# Altium PCB PCB1.PcbDoc
Units mm, origin at the board's own origin, x right, y up, seen from the top; angles counter-clockwise.
Board outline 56.43 x 50 mm, 4 copper layers (Top Layer, Int1 (GND), Int2 (GND), Bottom Layer), stack 1.96 mm thick; 71 components, 47 nets, 222 pads, 311 vias.
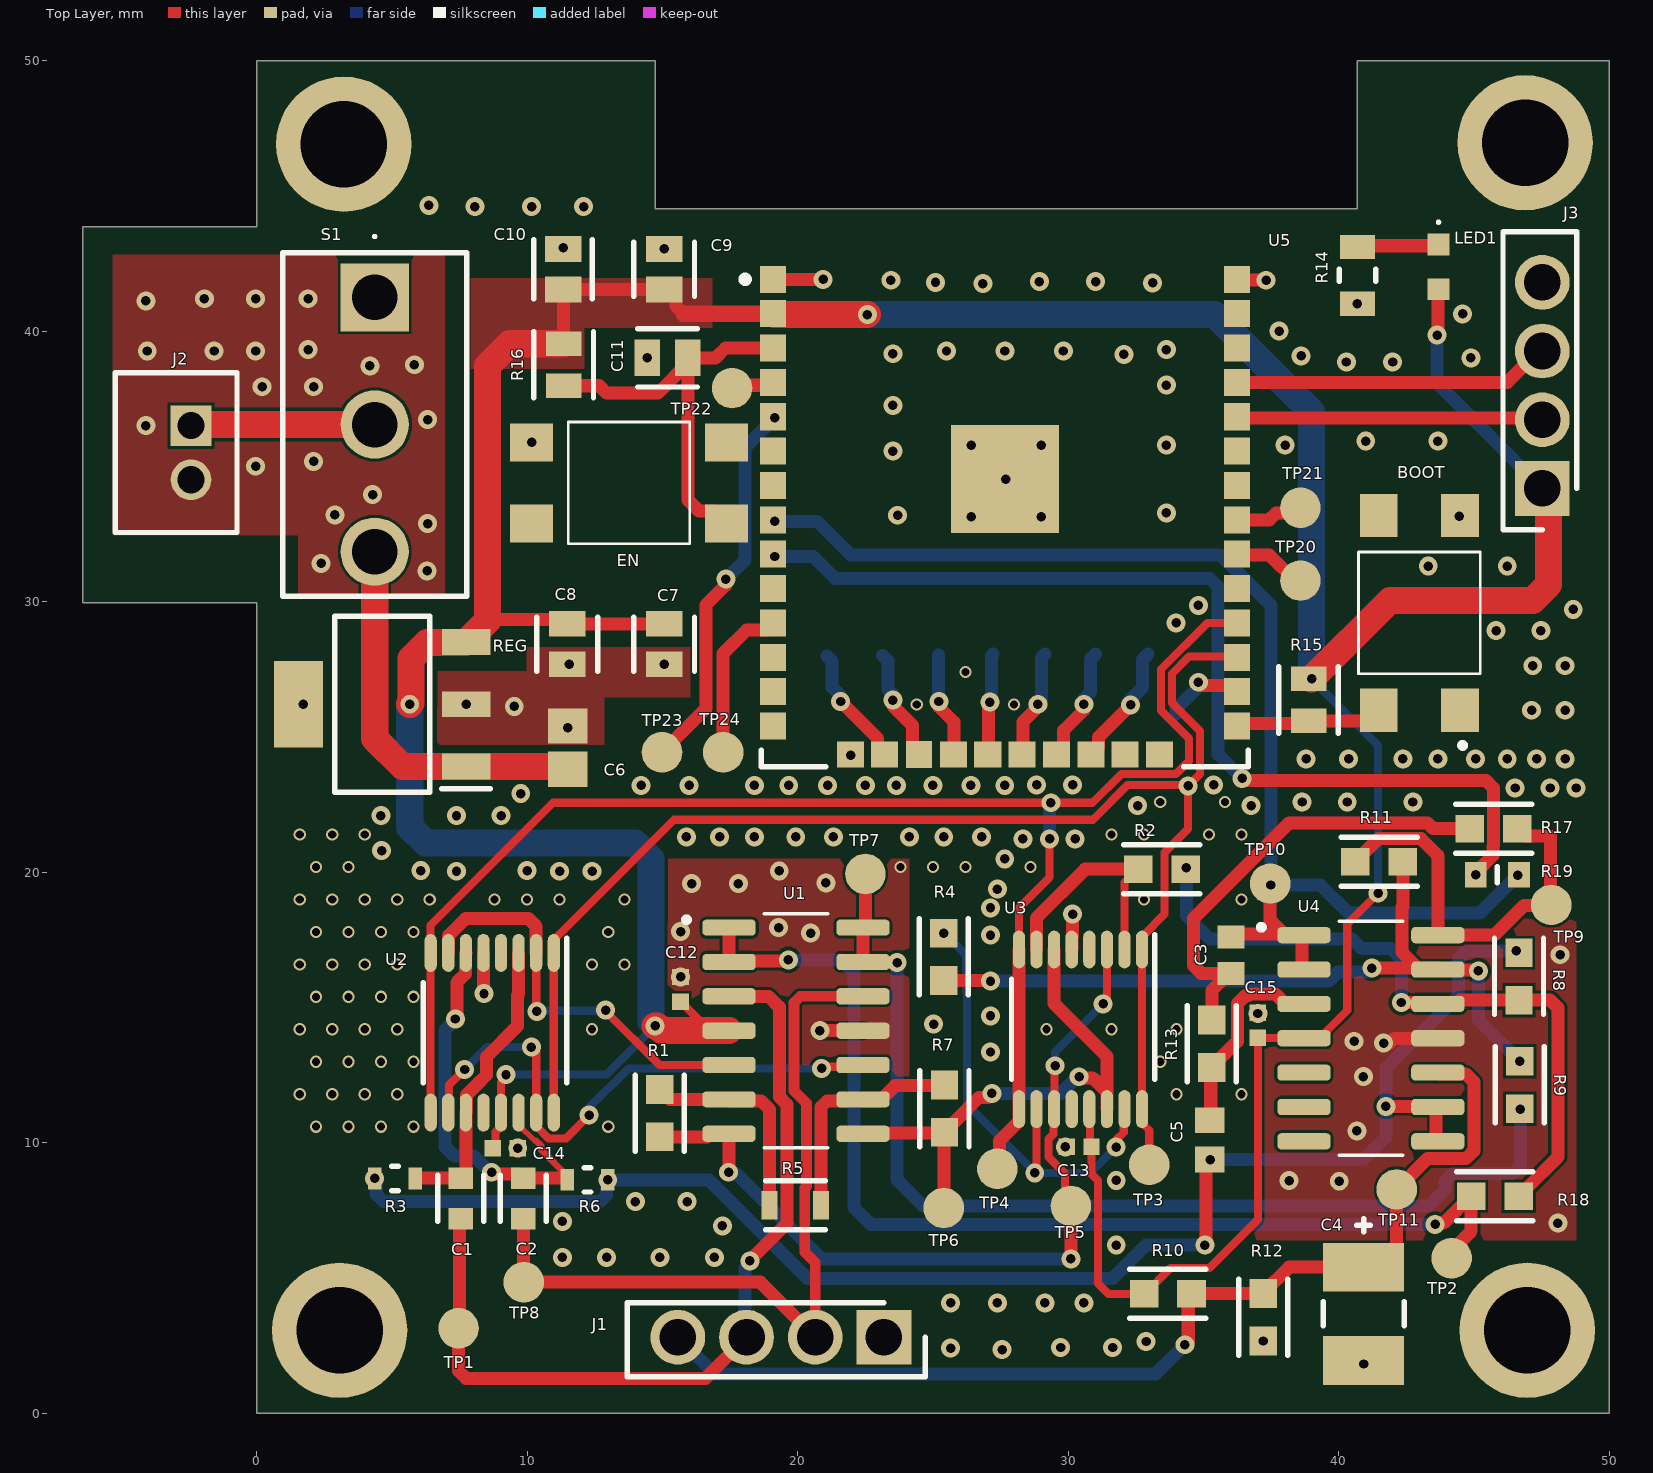
[diagram p0: Top Layer view]
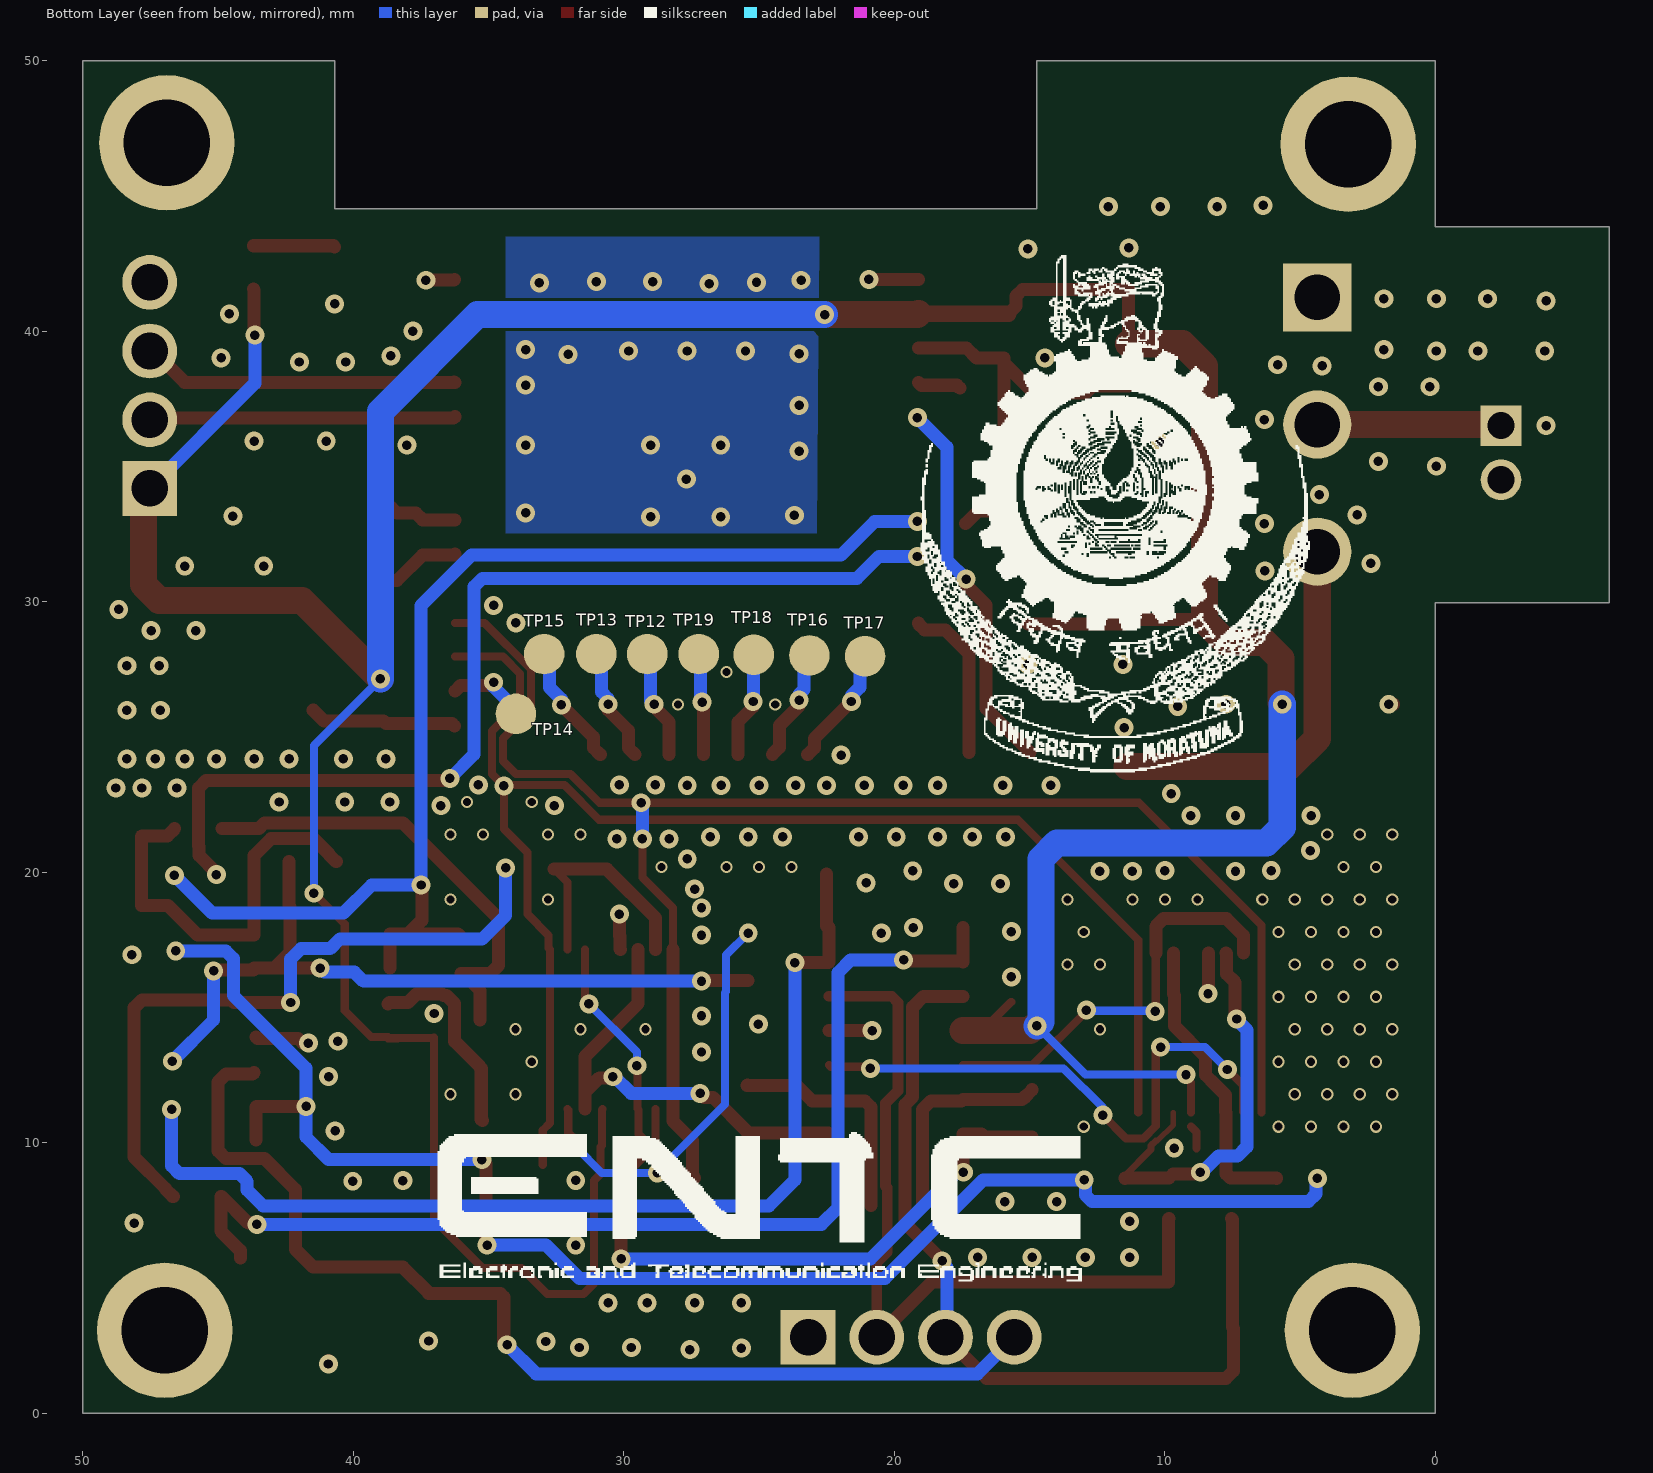
[diagram p1: Bottom Layer view, seen from below]
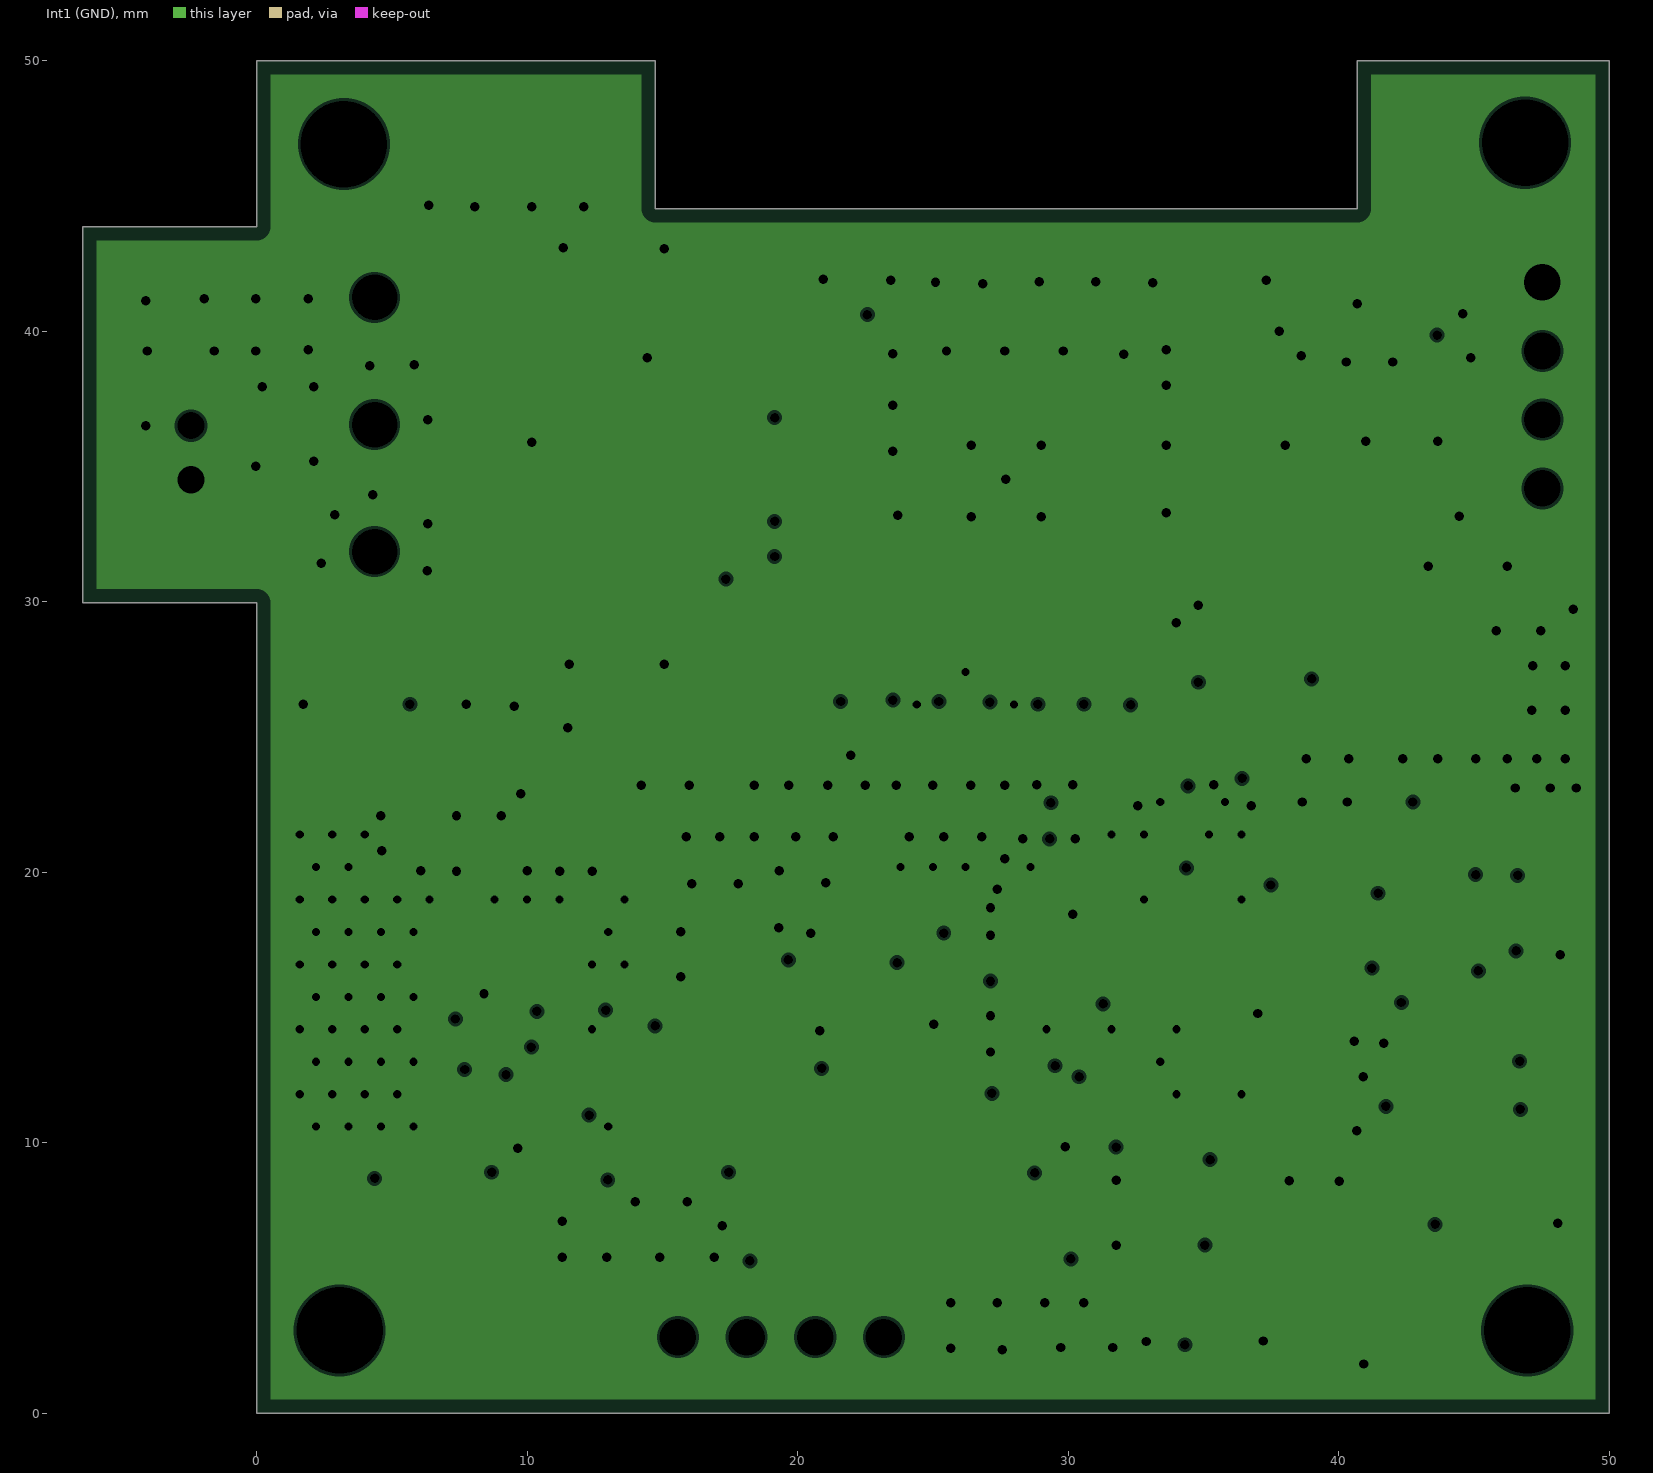
[diagram p2: Int1 (GND), clearances drawn from the general rule]
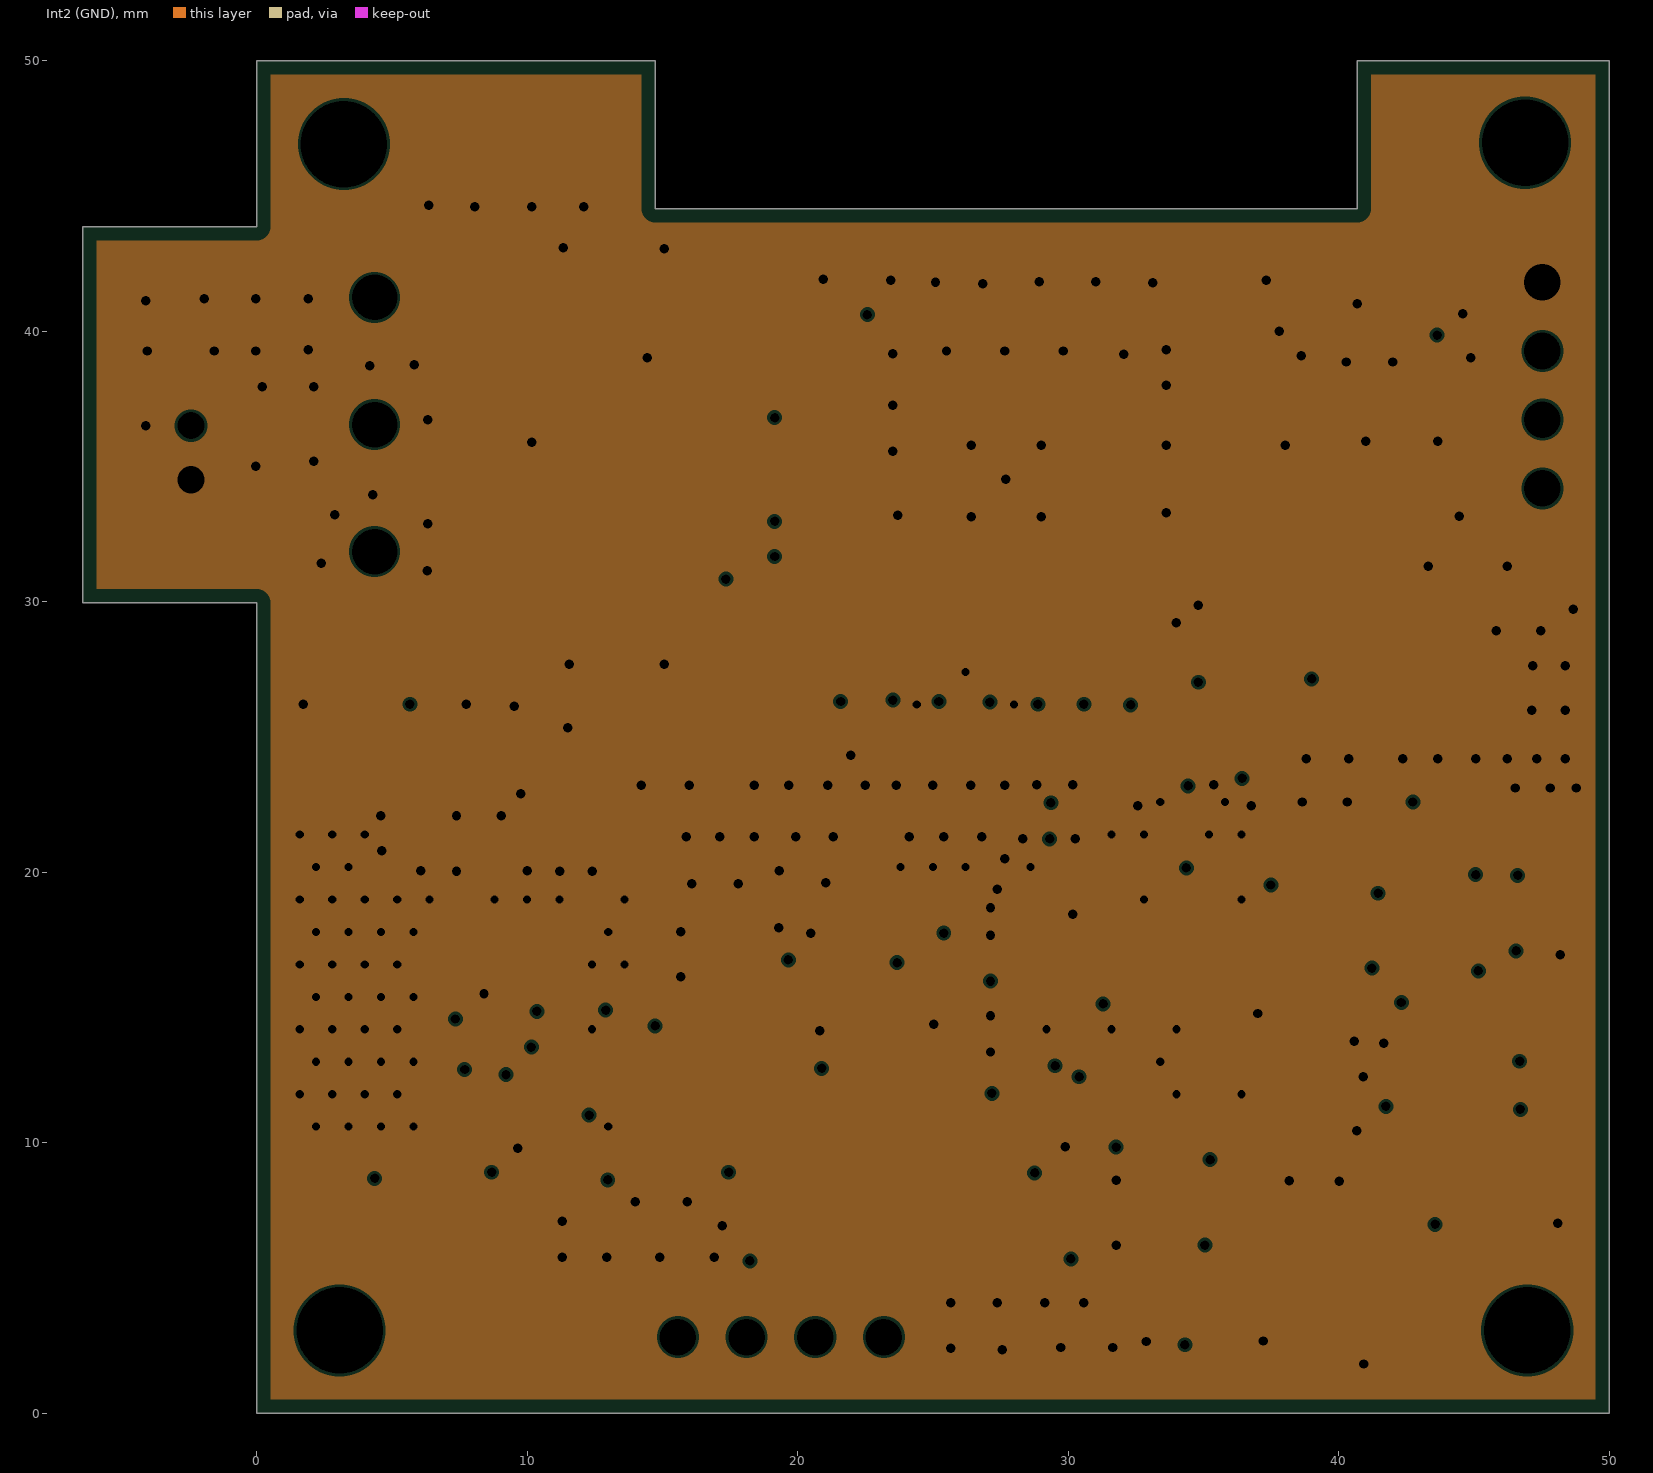
[diagram p3: Int2 (GND), clearances drawn from the general rule]
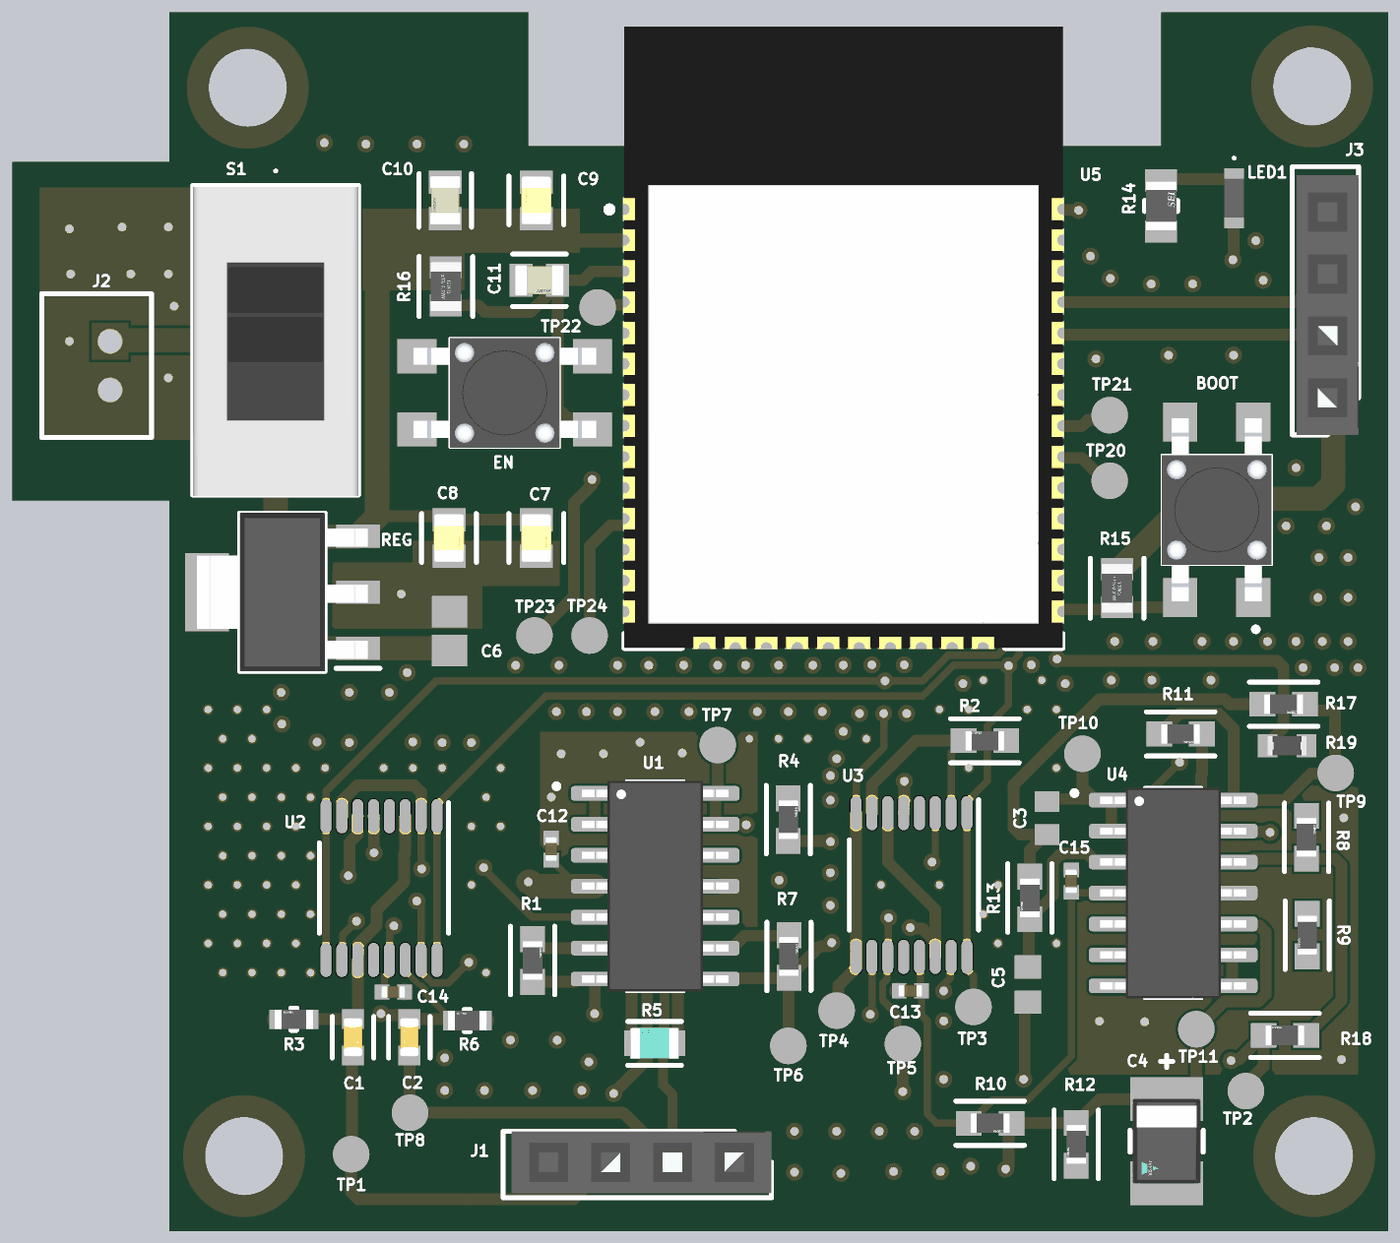
[diagram p4: 3D render of the assembled board from above, using the file's embedded part models]

## Layer stack, top to bottom
Top Solder: solder mask 0.0254, SM-001, Dk 4
Top Layer: signal copper 0.035
Dielectric 1: prepreg 0.11, PP-017, Dk 4.3
Int1 (GND): plane copper 0.035, net GND
Dielectric 3: core 1.6, Core-039, Dk 4.6
Int2 (GND): plane copper 0.035, net GND
Dielectric 2: prepreg 0.11, PP-017, Dk 4.3
Bottom Layer: signal copper 0.035
Bottom Solder: solder mask 0.0254, SM-001, Dk 4

## Board outline
0,43.866 -6.172,43.866 -6.426,43.866 -6.426,29.972 0,29.972 0,0 50,0 50,50 40.691,50 40.691,44.526 14.732,44.526 14.732,50 0,50

## Design rules (kind name [scope] priority, off if disabled: settings)
BoardOutlineClearance [All] p1: gap=0.2 ignorepadtopadclearanceinfootprint=FALSE
Clearance "Stitching GND" [IsStitchingVia and InNet('GND') vs (IsVia and (Not IsStitchingVia)) Or IsPad] p1: gap=0.127 ignorepadtopadclearanceinfootprint=FALSE
Clearance [All] p2: gap=0.102 ignorepadtopadclearanceinfootprint=FALSE except(0.127: Arc-Via Track-Via SMDPad-Via THPad-Via Via-Via Via-Fill Via-Poly Via-Region Via-Text; 0.25: Arc-Hole Track-Hole SMDPad-Hole THPad-Hole Via-Hole Fill-Hole Poly-Hole Region-Hole Text-Hole)
ComponentClearance [All] p1: gap=0.102 collisioncheckmode=3 verticalgap=0.102 showdistances=TRUE
DiffPairsRouting [All] p1: maxlimit=0.102 minlimit=0.102 mostfreqgap=0.102 toplayer_minwidth=0.102 toplayer_maxwidth=1816.048 toplayer_prefwidth=0.102 bottomlayer_minwidth=0.102 bottomlayer_maxwidth=1816.048 bottomlayer_prefwidth=0.102 maxuncoupledlength=12.7
Height [All] p1: minheight=0 maxheight=1816.048 prefheight=12.7
HoleSize [All] p1: absolutevalues=TRUE maxlimit=6.3 minlimit=0.2 maxpercent=80.000 minpercent=20.000
HoleToHoleClearance [All] p1: gap=0.25 allowstackedmicrovias=FALSE
MinimumAnnularRing [All] p1: minimumring=0.076
MinimumSolderMaskSliver [All] p1: minsoldermaskwidth=0
PlaneClearance [All] p1: clearance=0.102
PlaneConnect PlaneConnectPowerPads [InPadClass('PowerPads')] p1: planeconnectstyle=Direct reliefexpansion=0.508 reliefentries=4 reliefconductorwidth=0.254 reliefairgap=0.254
PlaneConnect [All] p2: pad.planeconnectstyle=Relief pad.reliefexpansion=0.3 pad.reliefentries=4 pad.reliefconductorwidth=0.102 pad.reliefairgap=0.102 via.planeconnectstyle=Direct via.reliefexpansion=0.3 via.reliefentries=4 via.reliefconductorwidth=0.127 via.reliefairgap=0.127
PolygonConnect PolygonConnectPowerPads [All vs (InPadClass('PowerPads'))] p1: connectstyle=Direct reliefconductorwidth=0.254 reliefentries=4 polygonreliefangle="90 Angle" airgapwidth=0.254
PolygonConnect [All] p2: connectstyle=Direct reliefconductorwidth=0.102 reliefentries=4 polygonreliefangle="90 Angle" airgapwidth=0.102
RoutingVias [All] p1: holewidth=0.35 width=0.7 viastyle="Through Hole" minholewidth=0.2 minwidth=0.45 maxholewidth=6.3 maxwidth=6.55
SilkToSilkClearance [All] p1: silktosilkclearance=0
SilkToSolderMaskClearance [IsPad] p1: minsilkscreentomaskgap=0.102 clearancetoexposedcopper=TRUE
SolderMaskExpansion [All] p1: expansion=0.075 istentingtop=TRUE
SupplyNets "Schematic Supply Nets_2" [InNet('IN3-_2')] p1: voltage=0.000
SupplyNets "Schematic Supply Nets_1" [InNet('GND')] p2: voltage=0.000
SupplyNets "Schematic Supply Nets" [InNet('VDD')] p3: voltage=0.000
Width [All] p1: maxlimit=1816.048 minlimit=0.102 preferedwidth=0.3 minimp=50.000000 maximp=50.000000 favimp=50.000000
20 further rules are at their usual default settings.

## Classes and differential pairs
component class Sheet_2: C1 C2 C3 C4 C5 C12 C13 C14 C15 J1 R1 R2 R3 R4 R5 R6 R7 R8 R9 R10 R11 R12 R13 R17 R18 TP1 TP2 TP3 TP4 TP5 TP6 TP7 TP8 TP9 TP10 TP11 U1 U2 U3 U4
component class Sheet_3: BOOT C6 C7 C8 C9 C10 C11 EN J2 J3 LED1 R14 R15 R16 R19 REG S1 TP12 TP13 TP14 TP15 TP16 TP17 TP18 TP19 TP20 TP21 TP22 TP23 TP24 U5

## Components (designator, comment, footprint, x,y, rotation, side; value= is the part's Value field where it differs from the comment)
BOOT "TL3305BF100QG" TL3305BF160QG 42.977,29.591 r90 top
C1 "1nF" FP-CC0603-DA-MFG 7.544,7.95 r90 top value="1.0 nF"
C2 "1nF" FP-CC0603-DA-MFG 9.855,7.95 r270 top value="1.0 nF"
C3 "VJ0603Y473KXAAC" CAPC1608X92X38NL15T08 36.017,16.942 r90 top
C4 "293D106X9016B2TE3" FP-293D-B-MFG 40.919,3.683 r90 top
C5 "VJ0603Y223KXAAC" CAPC1608X92X38ML15T08 35.23,10.109 r90 top
C6 "4.7uF" CAPC2013X145X50NL20T25 11.506,24.613 r270 top
C7 "10uF" FP-C0805C106K4PACTU-MFG 15.062,28.436 r270 top
C8 "10uF" FP-C0805C106K4PACTU-MFG 11.481,28.436 r270 top
C9 "10uF" FP-C0805C106K4PACTU-MFG 15.062,42.291 r90 top
C10 "0.1uF" FP-C0805C-DN-MFG 11.328,42.291 r90 top value="0.10 μF"
C11 "0.1uF" FP-C0805C-DN-MFG 15.189,39.014 r180 top value="0.10 μF"
C12 "100nF" CAPC1005X55N 15.672,15.675 r90 top
C13 "100nF" CAPC1005X55N 30.404,9.855 r180 top
C14 "100nF" CAPC1005X55N 9.195,9.804 r0 top
C15 "100nF" CAPC1005X55N 37.008,14.351 r270 top
EN "TL3305BF100QG" TL3305BF160QG 13.767,34.392 r180 top
J1 "PPPC041LFBN-RC" RHDR4W80P0X254_1X4_1066X254X850P 23.19,2.819 r180 top
J2 "B2B-PH-K-S(LF)(SN)" JST-B2B-PH-K-S_V -2.972,35.509 r270 top
J3 "PPPC041LFBN-RC" RHDR4W80P0X254_1X4_1066X254X850P 47.523,34.188 r90 top
LED1 "KP-1608QBC-D" KP1608QBCD 43.688,42.379 r270 top
R1 "10k" FP-AC0603-IPC_A 14.91,11.1 r90 top
R2 "10k" FP-AC0603-IPC_A 33.464,20.117 r180 top
R3 "4.7M" FP-ESR03-MFG 5.117,8.687 r0 top
R4 "10k" FP-AC0603-IPC_A 25.4,16.878 r90 top
R5 "2k" FP-RN732A-MFG 19.914,7.696 r180 top
R6 "4.7M" FP-ESR03-MFG 12.231,8.636 r0 top
R7 "10k" FP-AC0603-IPC_A 25.425,11.264 r90 top
R8 "10k" FP-AC0603-IPC_A 46.66,16.154 r90 top
R9 "10k" FP-AC0603-IPC_A 46.685,12.141 r270 top
R10 "10k" FP-AC0603-IPC_A 33.68,4.42 r0 top
R11 "10k" FP-AC0603-IPC_A 41.49,20.396 r0 top
R12 "10k" FP-AC0603-IPC_A 37.211,3.556 r270 top
R13 "10k" FP-AC0603-IPC_A 35.306,13.665 r270 top
R14 "4.7k" FP-RMCF0805-MFG 40.691,42.062 r90 top
R15 "10k" FP-CRGP0805-IPC_C 38.887,26.377 r270 top value=10KΩ
R16 "10k" FP-CRGP0805-IPC_C 11.354,38.76 r270 top value=10KΩ
R17 "10k" FP-AC0603-IPC_A 45.72,21.615 r0 top
R18 "10k" FP-AC0603-IPC_A 45.771,8.026 r180 top
R19 "0R" RESC1608X55N 45.86,19.914 r180 top
REG "TL1963A-33DCYR" SOT230P700X180-4N 4.648,26.213 r180 top
S1 "SLW-1276864-4A-D" SLW12768644AD 4.369,41.251 r270 top
TP1 "Test_Point" Test_Point-Footprint-1#1 7.468,3.15 r0 top
TP2 "Test_Point" Test_Point-Footprint-1#1 44.171,5.74 r90 top
TP3 "Test_Point" Test_Point-Footprint-1#1 32.995,9.195 r90 top
TP4 "Test_Point" Test_Point-Footprint-1#1 27.381,9.042 r90 top
TP5 "Test_Point" Test_Point-Footprint-1#1 30.099,7.671 r90 top
TP6 "Test_Point" Test_Point-Footprint-1#1 25.4,7.595 r90 top
TP7 "Test_Point" Test_Point-Footprint-1#1 22.504,19.939 r90 top
TP8 "Test_Point" Test_Point-Footprint-1#1 9.881,4.851 r90 top
TP9 "Test_Point" Test_Point-Footprint-1#1 47.854,18.796 r90 top
TP10 "Test_Point" Test_Point-Footprint-1#1 37.465,19.583 r90 top
TP11 "Test_Point" Test_Point-Footprint-1#1 42.139,8.28 r90 top
TP12 "Test_Point" Test_Point-Footprint-1#1 29.134,28.067 r90 bottom
TP13 "Test_Point" Test_Point-Footprint-1#1 31.013,28.067 r90 bottom
TP14 "Test_Point" Test_Point-Footprint-1#1 33.985,25.857 r90 bottom
TP15 "Test_Point" Test_Point-Footprint-1#1 32.944,28.067 r90 bottom
TP16 "Test_Point" Test_Point-Footprint-1#1 23.139,28.016 r90 bottom
TP17 "Test_Point" Test_Point-Footprint-1#1 21.082,27.991 r90 bottom
TP18 "Test_Point" Test_Point-Footprint-1#1 25.197,28.042 r90 bottom
TP19 "Test_Point" Test_Point-Footprint-1#1 27.229,28.067 r90 bottom
TP20 "Test_Point" Test_Point-Footprint-1#1 38.583,30.785 r90 top
TP21 "Test_Point" Test_Point-Footprint-1#1 38.583,33.477 r90 top
TP22 "Test_Point" Test_Point-Footprint-1#1 17.577,37.897 r90 top
TP23 "Test_Point" Test_Point-Footprint-1#2 14.986,24.435 r90 bottom
TP24 "Test_Point" Test_Point-Footprint-1#1 17.247,24.435 r90 top
U1 "TLV9064IDR" SOIC127P600X175-14N 19.939,14.148 r0 top
U2 "TMUX1111PWR" PW0016A_N 8.712,14.072 r270 top
U3 "TMUX1111PWR" PW0016A_N 30.455,14.199 r270 top
U4 "TLV9064IDR" SOIC127P600X175-14N 41.188,13.868 r0 top
U5 "ESP-WROOM-32" OLMX-ESP-WROOM-32 27.661,33.139 r0 top

## Footprints (in the part's own frame and the unit in brackets; to place one, negate y for a bottom-side part, rotate by r counter-clockwise, add the part's x,y. Pads: shape width x height; smd on the part's side, far side on the other; paste and mask are expansions set on the pad)
CAPC1005X55N [mm]
  rect 0.6x0.62 smd: 1(-0.46,0) 2(0.46,0)
  body extent -0.5,-0.25 0.5,0.25, height 0.55
CAPC1608X92X38ML15T08 [mm] "Chip Capacitor, 2-Leads, Body 1.60x0.80mm, IPC Low Density"
  rect 0.95x1.1 smd: 1(-0.725,0) 2(0.725,0)
  body extent -0.87,-0.48 0.87,0.47, height 0.92
CAPC1608X92X38NL15T08 [mm] "Chip Capacitor, 2-Leads, Body 1.60x0.80mm, IPC Medium Density"
  rect 0.85x1 smd: 1(-0.675,0) 2(0.675,0)
  body extent -0.87,-0.48 0.87,0.47, height 0.92
CAPC2013X145X50NL20T25 [mm] "Chip Capacitor, 2-Leads, Body 2.00x1.25mm, IPC Medium Density"
  rect 1.3x1.45 smd: 1(-0.8,0) 2(0.8,0)
  body extent -1.1,-0.72 1.1,0.72, height 1.45
FP-293D-B-MFG [mm]
  rect 1.8x3 smd paste+0 mask+0: 1(-1.725,0) 2(1.725,0)
  silkscreen extent -0.45,-1.5 3.52,1.5, body extent -2.73,-1.6 2.73,1.6, height 0.25
FP-AC0603-IPC_A [mm]
  rect 1.059x1.012 smd paste+0 mask+0: 1(-0.877,0) 2(0.877,0)
  silkscreen extent -1.41,-0.91 1.41,0.91, body extent -1.91,-1.01 1.91,1.01, height 0.25
FP-C0805C106K4PACTU-MFG [mm]
  rect 0.95x1.35 smd paste+0 mask+0: 1(-0.75,0) 2(0.75,0)
  silkscreen extent -1,-1.12 1,1.12, body extent -1.4,-0.85 1.4,0.85, height 0.25
FP-C0805C-DN-MFG [mm]
  rect 0.95x1.35 smd paste+0 mask+0: 1(-0.75,0) 2(0.75,0)
  silkscreen extent -1.1,-1.07 1.1,1.07, body extent -1.4,-0.85 1.4,0.85, height 0.25
FP-CC0603-DA-MFG [mm]
  rect 0.8x0.9 smd paste+0 mask+0: 1(-0.75,0) 2(0.75,0)
  silkscreen extent -0.85,-0.85 0.85,0.85, body extent -1.35,-0.75 1.35,0.75, height 0.25
FP-CRGP0805-IPC_C [mm]
  rect 0.906x1.31 smd paste+0 mask+0: 1(-0.776,0) 2(0.776,0)
  silkscreen extent -1.23,-1.1 1.23,1.1, body extent -1.33,-0.8 1.33,0.8, height 0.25
FP-ESR03-MFG [mm]
  rect 0.5x0.8 smd paste+0 mask+0: 1(-0.75,0) 2(0.75,0)
  silkscreen extent -0.13,-0.45 0.13,0.45, body extent -1.1,-0.55 1.1,0.55, height 0.25
FP-RMCF0805-MFG [mm]
  rect 0.9x1.3 smd paste+0 mask+0: 1(-1.05,0) 2(1.05,0)
  silkscreen extent -0.23,-0.67 0.23,0.67, body extent -1.6,-0.77 1.6,0.77, height 0.25
FP-RN732A-MFG [mm]
  rect 0.6x1.05 smd paste+0 mask+0: 1(-0.95,0) 2(0.95,0)
  silkscreen extent -1.1,-0.9 1.1,0.9, body extent -1.35,-0.82 1.35,0.82, height 0.25
JST-B2B-PH-K-S_V [mm] "Connector, 2-Leads, Body 5.9x4.5mm, Pitch 2mm"
  rect 1.5x1.5 hole 1: 1(-1,0.55)
  round 1.5 hole 1: 2(1,0.55)
  silkscreen extent -2.95,-2.25 2.95,2.25, body extent -2.95,-2.25 2.95,2.25, height 6
KP1608QBCD [mm]
  rect 0.8x0.8 smd: 1(-0.825,0) 2(0.825,0)
  silkscreen extent -1.7,-0.05 -1.6,0.05, body extent -0.8,-0.4 0.8,0.4, height 1.2
OLMX-ESP-WROOM-32 [mm] "SMD, 38-Leads, Body 18x25.5mm, Pitch 1.27mm"
  rect 0.95x1 smd: 1(-8.575,8.78) 2(-8.575,7.51) 3(-8.575,6.24) 4(-8.575,4.97) 5(-8.575,3.7) 6(-8.575,2.43) 7(-8.575,1.16) 8(-8.575,-0.11) 9(-8.575,-1.38) 10(-8.575,-2.65) 11(-8.575,-3.92) 12(-8.575,-5.19) 13(-8.575,-6.46) 14(-8.575,-7.73) 17(-3.175,-8.78) 25(8.575,-7.73) 26(8.575,-6.46) 27(8.575,-5.19) 28(8.575,-3.92) 29(8.575,-2.65) 30(8.575,-1.38) 31(8.575,-0.11) 32(8.575,1.16) 33(8.575,2.43) 34(8.575,3.7) 35(8.575,4.97) 36(8.575,6.24) 37(8.575,7.51) 38(8.575,8.78)
  rect 4x4 smd: 1(0,1.395)
  rect 1x0.95 smd: 15(-5.715,-8.78) 16(-4.445,-8.78) 18(-1.905,-8.78) 19(-0.635,-8.78) 20(0.635,-8.78) 21(1.905,-8.78) 22(3.175,-8.78) 23(4.445,-8.78) 24(5.715,-8.78)
  silkscreen extent -9.72,-9.23 9,8.9, body extent -9.04,-9.25 9.04,16.29, height 3.04
PW0016A_N [mm]
  oval 1.4x0.45 smd paste+0 mask+0.051: 1(-2.95,2.275) 2(-2.95,1.625) 3(-2.95,0.975) 4(-2.95,0.325) 5(-2.95,-0.325) 6(-2.95,-0.975) 7(-2.95,-1.625) 8(-2.95,-2.275) 9(2.95,-2.275) 10(2.95,-1.625) 11(2.95,-0.975) 12(2.95,-0.325) 13(2.95,0.325) 14(2.95,0.975) 15(2.95,1.625) 16(2.95,2.275)
  silkscreen extent -3.5,-2.55 1.85,2.75
RESC1608X55N [mm]
  rect 0.8x0.95 smd: 1(-0.8,0) 2(0.8,0)
  silkscreen extent 0,-0.3 0,0.3, body extent -0.8,-0.4 0.8,0.4, height 0.46
RHDR4W80P0X254_1X4_1066X254X850P [mm]
  rect 2.025x2.025 hole 1.35: 1(0,0)
  round 2.025 hole 1.35: 2(2.54,0) 3(5.08,0) 4(7.62,0)
  silkscreen extent -1.52,-1.27 9.49,1.46, body extent -1.52,-1.27 9.14,1.27, height 8.5
SLW12768644AD [mm]
  rect 2.52x2.52 hole 1.68: 1(0,0)
  round 2.52 hole 1.68: 2(4.7,0) 3(9.4,0)
  silkscreen extent -2.3,-3.4 11.05,3.4, body extent -1.6,-3.4 11.1,3.4, height 12.4
SOIC127P600X175-14N [mm]
  rrect50% 1.97x0.6 smd: 1(-2.475,3.81) 2(-2.475,2.54) 3(-2.475,1.27) 4(-2.475,0) 5(-2.475,-1.27) 6(-2.475,-2.54) 7(-2.475,-3.81) 8(2.475,-3.81) 9(2.475,-2.54) 10(2.475,-1.27) 11(2.475,0) 12(2.475,1.27) 13(2.475,2.54) 14(2.475,3.81)
  silkscreen extent -4.15,-4.33 1.17,4.33, body extent -3,-4.33 3,4.33, height 1.75
SOT230P700X180-4N [mm]
  rect 1.8x0.95 smd: 1(-3.1,2.3) 2(-3.1,0) 3(-3.1,-2.3)
  rect 1.8x3.2 smd: 4(3.1,0)
  silkscreen extent -4,-3.25 1.75,3.25, body extent -3.5,-3.25 3.5,3.25, height 1.68
Test_Point-Footprint-1#1 [mm]
  round 1.5 smd: 1(0,0)
Test_Point-Footprint-1#2 [mm]
  round 1.5 smd far side: 1(0,0)
TL3305BF160QG [mm]
  rect 1.6x1.4 smd: 1(-3.6,-1.5) 2(3.6,-1.5) 3(-3.6,1.5) 4(3.6,1.5)
  silkscreen extent -5,-2.25 2.25,2.25, body extent -3.75,-2.25 3.75,2.25, height 4.9

## Part data
BOOT EN: "Switch", Manufacturer_Name=E-Switch, Mouser Part Number=612-TL3305BF100QG, Datasheet Link=https://configured-product-images.s3.amazonaws.com/2D/specs/TL3305BF100QG.pdf, Manufacturer_Part_Number=TL3305BF100QG, Mouser Price/Stock=https://www.mouser.co.uk/ProductDetail/E-Switch/TL3305BF100QG?qs=IKkN%2F947nfDIPwqPQja%252BvQ%3D%3D
C1 C2: library part CMP-03422-000958-1, "CC0603 1.0 nF X7R 10.00% 50 V", Capacitance="1.0 nF", Manufacturer=YAGEO, Manufacturer Part Number=CC0603KPX7R9BB102, Package=CC0603-DA, Temperature="-55°C to +125°C", Temperature Characteristic=X7R, Temperature Coefficient=15%, Temperature Range High=+125°C, Temperature Range Low=-55°C, Tolerance=0.1, Voltage="50 V", Automotive=No, Category=Cap, ComponentLink2Description=Datasheet, ComponentLink2URL=http://www.yageo.com/documents/recent/UPY-GPHC_X7R_6.3V-to-50V_18.pdf, Device Class L1="Passive Components", Device Class L2=Capacitors, Device Class L3="Ceramic Capacitors", Footprint Url=http://www.yageo.com/exep/pages/download/literatures/UPY-C_GEN_24.pdf, Height=0.9mm, Lead Free=Yes, Material=Ceramic, Mouser Description="Multilayer Ceramic Capacitors MLCC - SMD/SMT 1.0nF 50V X7R 10%", Octopart=https://octopart.com/cc0603kpx7r9bb102-yageo-21769905, RoHS=TRUE, Voltage Rating="50 V"
C3: library part CMP-2006-01132-1, Manufacturer=Vitramon, Part Number=VJ0603Y473KXAAC
C4: library part CMP-02414-000004-1, "CAP TANT 10UF 10% 16V 1411", Capacitance=10uF, Case Code (Imperial)=1411, Case Code (Metric)=3528, Dielectric Material=Tantalum, ESR (Equivalent Series Resistance)=2R, Leakage Current=1.6uA, Max Operating Temperature=125°C, Min Operating Temperature=-55°C, Package Quantity=1, Ripple Current=160mA, Tolerance=10%, Voltage=16V, Case/Package=1411, Construction=Flat, Depth=2.8mm, Dissipation Factor=6%, Features="General Purpose", Height=1.9mm, Height - Seated (Max)=0.083inch, Lead Free="Lead Free", Length=3.5mm, Mount="Surface Mount", Packaging="Tape and Reel", Polarity=Polar, Q Factor=6, Radiation Hardening=No, RoHS Compliant=Yes, Series="TANTAMOUNT® 293D", Termination=SMD/SMT, Voltage Rating=16V, Voltage Rating (DC)=16V, Width=0.11inch
C5: library part CMP-2006-01144-1, Manufacturer=Vitramon, Part Number=VJ0603Y223KXAAC
C6: library part CMP-2007-01149-1, Manufacturer=Kemet, Part Number=C0805C475M8RACTU
C7 C8 C9: library part CMP-03020-034671-1, "CAP CER 10UF 16V X5R 0805", Case Code (Imperial)=0805, Case Code (Metric)=2012, Dielectric=X5R, Dielectric Material=Ceramic, Max Operating Temperature=85°C, Min Operating Temperature=-55°C, Package Quantity=1, Tolerance=10%, Voltage=16V, Capacitance=10uF, Case/Package=0805, Construction=Flat, Contact Plating=Tin, Depth=1.25mm, Dissipation Factor=5%, Height=1.25mm, Lead Free="Lead Free", Length=2mm, Mount="Surface Mount", Number of Pins=2, Packaging="Tape and Reel", Radiation Hardening=No, REACH SVHC="No SVHC", Series=C, Termination=SMD/SMT, Thickness=0.055inch, Voltage Rating=16V, Voltage Rating (DC)=16V, Width=0.049inch
C10 C11: library part CMP-2007-00274-2, "CAP CER 0.1UF 16V X7R 0805", Capacitance="0.10 μF", Manufacturer=KEMET, Manufacturer Part Number=C0805C104K4RACTU, Package=C0805C-DN, Temperature="-55°C to +125°C", Temperature Characteristic=X7R, Temperature Coefficient=30ppm/°C, Temperature Range High=+125°C, Temperature Range Low=-55°C, Tolerance=0.1, Voltage Rating="16 V", Automotive=No, Category=Cap, ComponentLink2Description=Datasheet, ComponentLink2URL=https://content.kemet.com/datasheets/KEM_C1003_C0G_SMD.pdf, Device Class L1="Passive Components", Device Class L2=Capacitors, Device Class L3="Ceramic Capacitors", Digikey Description="CAP CER 0.1UF 16V X7R 0805", Height=0.88mm, Ipc Land Pattern Name=CAPC200125X78, Lead Free=Yes, Material=Ceramic, Mouser Description="Multilayer Ceramic Capacitors MLCC - SMD/SMT 16volts 0.1uF X7R 10%", Octopart=https://octopart.com/c0805c104k4ractu-kemet-92155, RoHS=TRUE
C12 C13 C14 C15: library part CL05B104KO5NNNC, "Capacitor", Manufacturer_Name=SAMSUNG, Mouser Part Number=187-CL05B104KO5NNNC, Arrow Part Number=CL05B104KO5NNNC, Arrow Price/Stock=https://www.arrow.com/en/products/cl05b104ko5nnnc/samsung-electro-mechanics.html?utm_currency=USD&region=europe, Datasheet Link=https://datasheet.datasheetarchive.com/originals/distributors/Datasheets-DGA10/2408147.pdf, Height=0.55mm, Manufacturer_Part_Number=CL05B104KO5NNNC, Mouser Price/Stock=https://www.mouser.co.uk/ProductDetail/Samsung-Electro-Mechanics/CL05B104KO5NNNC?qs=hqM3L16%252BxlfT2SKOuAUq6Q%3D%3D
J1 J3: "Connector", Manufacturer_Name=Sullins, Datasheet Link=https://drawings-pdf.s3.amazonaws.com/10492.pdf, Height=8.5mm, Manufacturer_Part_Number=PPPC041LFBN-RC
J2: library part CMP-2000-05162-1, "Male Header, Pitch 2 mm, 1 x 2 Position, Height 6 mm, Tail Length 3.4 mm, -25 to 85 degC, RoHS, Bulk", Manufacturer=JST, Datasheet URL=http://datasheet.octopart.com/B2B-PH-K-S%28LF%29%28SN%29-JST-datasheet-8324864.pdf, Datasheet Version=Nov-08, Manufacturer URL=http://www.jst.com/home2.html, No of Positions=2, Pitch=2mm, Style/Orientation=StraightHeader/Plug, Termination=Crimp, Type=ShroudedHeader
LED1: "LED", Manufacturer_Name=Kingbright, Mouser Part Number=N/A, Arrow Part Number=KP-1608QBC-D, Arrow Price/Stock=https://www.arrow.com/en/products/kp-1608qbc-d/kingbright?region=europe, Datasheet Link=https://www.kingbright.com/attachments/file/psearch/000/00/00/KP-1608QBC-D(Ver.24B).pdf, Height=1.1mm, Manufacturer_Part_Number=KP-1608QBC-D, Mouser Price/Stock=https://www.mouser.co.uk/ProductDetail/Kingbright/KP-1608QBC-D?qs=2JU0tDl2GZ0HuHAuzYJmHg%3D%3D
R1 R2 R4 R7 R8 R9 R10 R11 R12 R13 R17 R18: library part CMP-03412-040683-1, "RES 10kΩ 5.00% 0.2W 0603"
R3 R6: library part CMP-08839-028186-1, "4.7MΩ ±1% 0.25W 0603 Anti-Surge Chip Resistor AEC-Q200", Case/Package=0603, Max Operating Temperature=155°C, Max Power Dissipation=250mW, Min Operating Temperature=-55°C, Resistance=4.7MR, Resistor Type="Thick Film", Temperature Coefficient=100ppm/°C, Tolerance=1%, Features="Automotive AEC-Q200", Number of Terminations=2, Packaging="Tape and Reel", RoHS Compliant=Yes, Series=ESR
R5: library part CMP-04015-025759-1, "2kΩ ±0.1% 0.1W, 1/10W Chip Resistor 0805 (2012 Metric) Moisture Resistant Thin Film", Case Code (Imperial)=0805, Case Code (Metric)=2012, Max Operating Temperature=125°C, Min Operating Temperature=-55°C, Power Rating=100mW, Resistance=2kR, Temperature Coefficient=25ppm/°C, Tolerance=0.1%, Voltage Rating=100V, Case/Package=0805, Composition="Thin Film", Height=0.5mm, Length=2mm, Packaging="Tape and Reel", Termination=SMD/SMT, Voltage Rating (DC)=100V, Weight=0.000194oz, Width=1.2mm
R14: library part CMP-26527-004085-1, "4.7kΩ ±5% 0.125W 0805 Thick Film Chip Resistor AEC-Q200 compliant", Case Code (Imperial)=0805, Case Code (Metric)=2012, Max Operating Temperature=155°C, Max Power Dissipation=125mW, Min Operating Temperature=-55°C, Package Quantity=10000, Resistance=4.7kR, Resistor Type="Thick Film", Temperature Coefficient=200ppm/°C, Tolerance=5%, Case/Package=0805, Contact Plating=Tin, Features="Automotive AEC-Q200", Height=0.026inch, Length=0.079inch, Mount="Surface Mount", Number of Terminations=2, Packaging="Tape and Reel", Radiation Hardening=No, RoHS Compliant=Yes, Series=RMCF, Width=0.049inch
R15 R16: library part CMP-03211-006861-1, "CRGP 0805 10K 1%", Ambient Temperature Range High=+70°C, Manufacturer=TE, Manufacturer Part Number=CRGP0805F10K, Package=CRGP0805, Power Rating=0.33W, Resistance=10KΩ, Temperature="-55°C to +155°C", Temperature Coefficient=±100ppm/°C, Temperature Range High=+155°C, Temperature Range Low=-55°C, Tolerance=0.01, Voltage Rating=150V, Automotive=No, Category=Res, ComponentLink2Description=Datasheet, ComponentLink2URL=https://www.mouser.com/datasheet/2/418/NG_DS_9-1773463-9_A-1358566.pdf, Composition="Thick Film", Device Class L1="Passive Components", Device Class L2=Resistors, Device Class L3="Chip SMD Resistors", Digikey Description="CRGP 0805 10K 1%", Height=0.65mm, Ipc Land Pattern Name=RESC200125X55, Lead Free=Yes, Octopart=https://octopart.com/crgp0805f10k-te+connectivity-91018782, RoHS=TRUE, Series=CRGP
R19: library part RC0603JR-070RL, "Resistor", Manufacturer_Name="Yageo Group", Mouser Part Number=603-RC0603JR-070RL, Arrow Part Number=RC0603JR-070RL, Arrow Price/Stock=https://www.arrow.com/en/products/rc0603jr-070rl/yageo?utm_currency=USD&region=nac, Datasheet Link=http://www.yageo.com/documents/recent/PYu-RC0603_51_RoHS_L_v5.pdf, Height=0.55mm, Manufacturer_Part_Number=RC0603JR-070RL, Mouser Price/Stock=https://www.mouser.co.uk/ProductDetail/YAGEO/RC0603JR-070RL?qs=2cAdsCoAWRGWyPcuXgGiXQ%3D%3D
REG: "Power Supply", Manufacturer_Name="Texas Instruments", Mouser Part Number=595-TL1963A-33DCYR, Arrow Part Number=TL1963A-33DCYR, Arrow Price/Stock=https://www.arrow.com/en/products/tl1963a-33dcyr/texas-instruments?utm_currency=USD&region=nac, Datasheet Link=http://www.ti.com/lit/gpn/tl1963a, Height=1.8mm, Manufacturer_Part_Number=TL1963A-33DCYR, Mouser Price/Stock=https://www.mouser.co.uk/ProductDetail/Texas-Instruments/TL1963A-33DCYR?qs=IK5e5L0zOXhRu%2FNTAfJNEA%3D%3D
S1: "Switch", Manufacturer_Name="Same Sky", Mouser Part Number=179-SLW-1276864-4A-D, Arrow Part Number=SLW-1276864-4A-D, Arrow Price/Stock=https://www.arrow.com/en/products/slw-1276864-4a-d/cui-devices?utm_currency=USD&region=nac, Datasheet Link=https://www.sameskydevices.com/product/resource/supplyframepdf/slw-1276864-4a-d.pdf, Height=10.6mm, Manufacturer_Part_Number=SLW-1276864-4A-D, Mouser Price/Stock=https://www.mouser.co.uk/ProductDetail/Same-Sky/SLW-1276864-4A-D?qs=1Kr7Jg1SGW90vOt02EYiag%3D%3D
TP1 TP2 TP3 TP4 TP5 TP6 TP7 TP8 TP9 TP10 TP11 TP12 TP13 TP14 TP15 TP16 TP17 TP18 TP19 TP20 TP21 TP22 TP23 TP24: library part CMP-00030-00001-2
U1 U4: "Quad, 5.5-V, 10-MHz, RRIO operational amplifier for cost-optimized applications", Package="SOIC-14 Texas Instruments", Check_prices=https://www.snapeda.com/parts/TLV9064IDR/Texas+Instruments/view-part/?ref=eda, MF="Texas Instruments", MP=TLV9064IDR, SnapEDA_Link=https://www.snapeda.com/parts/TLV9064IDR/Texas+Instruments/view-part/?ref=snap
U2 U3: "3-pA on-state leakage current, 5-V, 1:1 (SPST), 4-channel precision switch (4 active low) 16-TSSOP -40 to 125", Manufacturer_Name="Texas Instruments", Copyright="Copyright (C) 2026 Ultra Librarian. All rights reserved.", Datasheet=https://www.ti.com/lit/gpn/tmux1111, Manufacturer_Part_Number=TMUX1111PWR, RefDes=RefDes, Type=TYPE
U5: library part CMP-2000-07454-1, "Espressif System, 2.7 to 3.6 V, -40 to 85 degC, 38-Pin SMD", Manufacturer=Olimex, Package Description="38-Pin Surface Mount Device, Body 18 x 25.5 mm, Pitch 1.27 mm", Datasheet URL=http://www.espressif.com/sites/default/files/documentation/esp-wroom-32_datasheet_en.pdf, Datasheet Version="Rev. 2.1, 09/2017", Manufacturer URL=https://www.olimex.com, Mounting Technology=SurfaceMount, Package Reference=ESP-WROOM-32, RoHSCompliant=false

## Free pads (board coordinates)
  round 5 hole 3.2 unplated mask-5: 2(3.073,3.073) 2(3.226,46.914) 2(46.888,46.965) 2(46.965,3.073)

## Via types
v1: diameter 0.7, hole 0.35, Top Layer to Bottom Layer, tented both sides, 243 vias
v2: diameter 0.45, hole 0.3, Top Layer to Bottom Layer, tented both sides, 68 vias

## Nets (pads, with @x,y where several pads share a name; then routed paths per layer and width w, separated by ;. In a path a pad name is that pad's centre, name@x,y a point inside that pad or via, vN(x,y) a via of type N, cw(c..) or ccw(c..) an arc to the next point about the centre after c; other vN are vias at no path point)
BAT: C6.2 REG.1 S1.3 | length 14.5
  Top Layer w0.481: C6.2@11.406,23.913 C6.2
  Top Layer w1: S1.3 4.369,24.943 5.399,23.913 REG.1 C6.2@11.406,23.913
BOOT: BOOT.3 R15.2 U5.25 | length 5.5
  Top Layer w0.481: U5.25@36.261,25.409 36.357,25.505 38.791,25.505 R15.2 41.086,25.6 BOOT.3
Buffer: C4.2 J1.4 R10.2 R12.1 TP11.1 U4.10 | length 39.7
  Top Layer w0.481: v1(34.315,2.54) 34.436,2.661 34.436,4.299 R10.2 34.564,4.426 37.204,4.426 R12.1 37.211,4.456 38.163,5.408 C4.2 41.479,5.408 42.139,6.068 TP11.1 43.275,9.416 44.701,9.416 44.99,9.705 44.99,12.257 44.708,12.539 43.722,12.539 U4.10
  Bottom Layer w0.481: J1.4 16.925,1.465 33.24,1.465 v1(34.315,2.54)
CLK: TP3.1 U2.1 U2.16 U3.1 U3.16 U5.27 | length 54.5
  Top Layer w0.3: U2.16 10.987,17.497 15.436,21.946 30.912,21.946 32.197,23.23 v1@34.265,23.23 ; TP3.1 32.995,10.468 32.73,10.733 U3.16 U3.1 32.779,17.198 32.779,17.673 33.56,18.454 33.56,20.727 34.434,21.601 34.434,23.03 34.265,23.199 v1(34.434,23.199) 34.434,23.206 34.869,23.641 34.869,25.224 33.835,26.258 33.835,27.342 34.467,27.974 U5.27@36.236,27.974
CLK': TP4.1 U2.8 U2.9 U3.8 U3.9 U5.28 | length 59.5
  Top Layer w0.3: U2.9 6.437,18.045 10.965,22.573 30.904,22.573 31.963,23.632 33.98,23.632 34.468,24.12 34.468,24.943 33.434,25.977 33.434,27.508 35.144,29.219 U5.28 ; U3.8 28.18,18.683 29.312,19.815 v1(29.312,21.234)
  Top Layer w0.481: TP4.1@27.381,8.708 27.459,8.786 27.459,10.084 28.18,10.805 U3.9 U3.8
  Bottom Layer w0.481: v1(29.312,21.234) 29.312,22.463 29.362,22.513 v1(29.362,22.573)
EN: C11.1 EN.3 R16.2 U5.3 | length 15.5
  Top Layer w0.481: R16.2 12.663,37.984 12.929,37.719 14.844,37.719 C11.1@15.939,38.814 ; EN.3 16.907,33.351 16.357,33.351 15.939,33.769 C11.1@15.939,38.814 ; U5.3@19.111,39.379 17.331,39.379 16.967,39.014 C11.1 C11.1@15.939,38.814
GND: BOOT.2 C4.1 C6.1 C7.2 C8.2 C9.2 C10.2 C11.2 C12.2 C13.2 C14.2 C15.1 EN.2 J2.2 J3.4 R12.2 R14.1 REG.2 REG.4 U1.11 U2.5 U3.5 U4.11 U5.1 U5.15 U5.38 | length 10.1
  Top Layer w0.381: C10.2 v1(11.328,43.078)
  Top Layer w0.481: REG.4 v1(1.727,26.213) ; U2.5 8.397,17.011 8.397,15.529 v1(8.407,15.519) ; v1(9.655,9.804) 9.655,9.794 C14.2@9.714,9.735 ; C8.2 v1(11.557,27.686) ; v1(11.506,25.349) C6.1 ; U5.1@19.111,41.919 v1(20.938,41.919) ; v1(20.825,14.148) U1.11 ; U5.15 v1(21.971,24.333) ; v1(29.896,9.855) C13.2 ; U3.5 30.145,17.164 30.145,17.639 30.16,17.654 v1(30.16,18.454) ; U5.38@36.261,41.919 36.278,41.902 37.296,41.902 v1(37.313,41.885) ; v1(37.008,14.783) C15.1 ; v1(40.919,1.829) C4.1 ; v1(41.656,13.691) 41.87,13.691 42.039,13.86 43.538,13.86 U4.11@43.598,13.919 ; v1(44.45,33.164) BOOT.2
  other v1: 27.559,2.362 25.654,2.413 29.718,2.438 31.642,2.438 32.88,2.661 37.211,2.679 25.654,4.089 27.381,4.089 29.134,4.089 30.582,4.089 11.303,5.766 12.939,5.766 14.91,5.766 16.925,5.766 31.774,6.223 17.221,6.934 48.095,7.034 11.303,7.1 14.004,7.833 15.916,7.833 40.018,8.583 31.774,8.616 38.163,8.609 40.669,10.445 40.908,12.448 27.127,13.36 40.569,13.758 25.025,14.394 27.127,14.699 15.672,16.135 48.182,16.954 27.127,17.678 20.476,17.755 15.672,17.808 19.296,17.958 27.127,18.683 27.381,19.38 16.083,19.583 17.813,19.583 21.046,19.61 7.391,20.041 11.2,20.041 12.4,20.041 19.321,20.051 6.071,20.066 10,20.066 27.655,20.496 4.623,20.803 28.321,21.234 30.252,21.234 15.889,21.311 17.115,21.311 18.397,21.311 19.93,21.311 21.322,21.311 24.13,21.311 25.4,21.311 26.797,21.311 4.597,22.098 7.391,22.098 9.037,22.098 32.564,22.463 36.758,22.463 38.648,22.6 40.312,22.6 9.766,22.913 46.52,23.117 47.812,23.117 48.768,23.117 14.212,23.216 15.989,23.216 18.397,23.216 19.671,23.216 21.109,23.216 22.504,23.216 23.649,23.216 25,23.216 26.406,23.216 27.655,23.216 28.83,23.23 30.16,23.23 35.37,23.23 38.791,24.191 40.361,24.191 42.367,24.191 43.663,24.191 45.06,24.191 46.227,24.191 47.31,24.191 48.362,24.191 47.126,25.991 48.362,25.991 9.525,26.137 7.748,26.213 47.168,27.635 48.362,27.635 15.062,27.686 45.818,28.931 47.473,28.931 33.985,29.219 48.666,29.718 34.809,29.87 6.302,31.142 43.307,31.318 46.227,31.318 2.388,31.42 6.325,32.892 26.416,33.139 29.007,33.139 23.698,33.198 2.898,33.212 33.63,33.282 4.293,33.96 27.686,34.534 -0.031,35.009 2.108,35.189 23.52,35.569 26.416,35.789 29.007,35.789 33.63,35.789 38.018,35.789 10.167,35.892 40.996,35.941 43.663,35.941 -4.089,36.509 6.325,36.73 23.52,37.262 0.203,37.948 2.108,37.948 33.63,38.011 4.19,38.722 5.831,38.76 40.284,38.862 41.986,38.862 14.439,39.014 44.882,39.014 38.608,39.091 32.055,39.141 23.52,39.167 -4.039,39.268 -1.57,39.268 -0.031,39.268 25.502,39.268 27.661,39.268 29.82,39.268 1.905,39.319 33.63,39.319 37.795,40.001 44.577,40.64 40.691,41.012 -4.089,41.123 -1.93,41.199 -0.031,41.199 1.905,41.199 26.848,41.758 33.122,41.783 25.095,41.808 28.931,41.834 31.013,41.834 23.444,41.885 15.062,43.041 8.069,44.602 10.165,44.602 12.09,44.602 6.367,44.653
  other v2: 2.2,10.6 3.4,10.6 4.6,10.6 5.8,10.6 13,10.6 1.6,11.8 2.8,11.8 4,11.8 5.2,11.8 34,11.8 36.4,11.8 2.2,13 3.4,13 4.6,13 5.8,13 33.4,13 1.6,14.2 2.8,14.2 4,14.2 5.2,14.2 12.4,14.2 29.2,14.2 31.6,14.2 34,14.2 2.2,15.4 3.4,15.4 4.6,15.4 5.8,15.4 1.6,16.6 2.8,16.6 4,16.6 5.2,16.6 12.4,16.6 13.6,16.6 2.2,17.8 3.4,17.8 4.6,17.8 5.8,17.8 13,17.8 1.6,19 2.8,19 4,19 5.2,19 6.4,19 8.8,19 10,19 11.2,19 13.6,19 32.8,19 36.4,19 2.2,20.2 3.4,20.2 23.8,20.2 25,20.2 26.2,20.2 28.6,20.2 1.6,21.4 2.8,21.4 4,21.4 31.6,21.4 32.8,21.4 35.2,21.4 36.4,21.4 33.4,22.6 35.8,22.6 24.4,26.2 28,26.2 26.2,27.4
IN3-_2: C5.1 R3.1 R6.2 R8.2 U4.8 U4.9 | length 57.1
  Top Layer w0.481: v1(35.052,6.223) 35.094,6.265 35.094,9.235 v1(35.244,9.384) C5.1 ; v1(41.744,11.354) 43.572,11.354 43.598,11.328 U4.8@43.598,10.109
  Bottom Layer w0.481: v1(4.367,8.687) 4.409,8.645 4.409,8.115 4.691,7.833 12.699,7.833 12.939,8.073 12.939,8.594 v1(12.981,8.636) 16.715,8.636 20.353,4.997 31.642,4.997 32.868,6.223 v1(35.052,6.223) ; v1(35.244,9.384) 40.908,9.384 41.744,10.221 v1(41.744,11.354) 41.744,12.764 44.425,15.445 44.425,16.812 44.706,17.094 v1(46.558,17.094)
IN4+_2: R2.1 R8.1 R18.1 U4.12 | length 25.6
  Top Layer w0.481: R2.1 34.366,20.142 v1(34.366,20.168) ; v1(42.316,15.189) 44.398,15.189 44.487,15.278 R8.1 47.814,15.278 48.095,14.996 48.095,9.474 46.936,8.315 46.936,8.292 46.671,8.026 R18.1
  Bottom Layer w0.481: v1(34.366,20.168) 34.366,18.406 35.235,17.537 40.492,17.537 40.852,17.177 41.93,17.177 42.316,16.79 v1(42.316,15.189)
NetC1_2: C1.2 R3.2 U2.3 U2.11 | length 10.9
  Top Layer w0.481: R3.2 5.867,8.691 5.877,8.7 C1.2 7.578,8.7 7.737,8.86 U2.11 7.753,11.137 7.753,11.764 8.152,12.164 8.156,12.164 8.503,12.51 8.503,13.176 9.643,14.316 9.643,15.453 9.687,15.497 U2.3
NetC2_1: C2.1 R6.1 U2.6 U2.14 | length 15.5
  Top Layer w0.2: U2.14 9.687,10.667 10.273,10.081 10.328,10.081
  Top Layer w0.25: 10.328,10.081 10.511,9.899 10.511,9.756 11.481,8.786 R6.1@11.481,8.691
  Top Layer w0.481: v1(7.349,14.58) 7.405,14.635 7.405,15.935 7.722,16.251 7.722,17.006 U2.6 ; v1(8.687,8.915) 8.746,8.915 8.802,8.86 C2.1@9.696,8.86 ; C2.1 11.471,8.7 R6.1@11.481,8.691
  Bottom Layer w0.481: v1(7.349,14.58) 7.349,14.553 6.974,14.177 6.974,9.858 7.314,9.517 8.025,9.517 8.628,8.915 v1(8.687,8.915)
NetC3_1: C3.1 R13.1 R17.1 | length 17
  Top Layer w0.481: R13.1 35.306,15.631 C3.1@35.942,16.267 ; C3.1 C3.1@35.942,16.267 ; R17.1 43.491,21.615 43.28,21.827 38.164,21.827 34.635,18.298 34.635,16.549 34.917,16.267 C3.1@35.942,16.267
NetC3_2: C3.2 R19.1 TP10.1 U4.1 U4.2 U5.8 | length 46.2
  Top Layer w0.481: C3.2 36.13,17.729 U4.1@37.963,17.729 ; v1(37.49,19.533) 37.49,19.558 TP10.1 37.465,18.227 U4.1@37.963,17.729 ; U4.2@38.648,16.459 38.648,17.729 U4.1@37.963,17.729
  Bottom Layer w0.481: v1(19.152,32.969) 20.726,32.969 21.971,31.725 35.636,31.725 37.49,29.87 v1(37.49,19.533) 39.321,19.533 40.362,18.491 45.211,18.491 v1(46.608,19.888)
NetC5_2: C5.2 R13.2 U4.3 | length 7.5
  Top Layer w0.481: C5.2 35.268,10.872 35.268,12.75 R13.2 35.306,12.812 36.252,13.758 36.252,15.149 36.556,15.453 36.663,15.453 36.711,15.5 37.666,15.5 37.968,15.198 38.653,15.198 U4.3
NetJ2_1: J2.1 S1.2 | length 6.7
  Top Layer w1: J2.1@-2.38,36.551 S1.2
NetLED1_1: LED1.1 R14.2 | length 3
  Top Layer w0.481: R14.2 40.737,43.158 LED1.1@43.688,43.158
NetR1_1: R1.1 TP5.1 U1.7 U3.3 U3.11 | length 30.7
  Top Layer w0.3: v1(29.515,12.852) 29.497,12.835 29.497,11.266 U3.11 29.451,11.22 29.451,10.328 29.269,10.146 29.269,9.486 29.884,8.871 29.884,7.886 TP5.1 ; v1(31.293,15.138) 31.43,15.275 U3.3
  Top Layer w0.481: R1.1 16.664,10.223 16.779,10.338 U1.7 17.464,8.93 v1(17.45,8.915) ; v1(30.099,5.715) TP5.1
  Bottom Layer w0.3: v1(29.515,12.852) 29.515,13.36 v1(31.293,15.138)
  Bottom Layer w0.481: v1(17.45,8.915) 17.492,8.873 17.72,8.873 20.879,5.715 v1(30.099,5.715)
NetR1_2: R1.2 R5.2 U1.6 | length 7.9
  Top Layer w0.481: R1.2 14.91,11.953 15.175,11.688 15.199,11.688 15.279,11.608 U1.6 17.524,11.548 18.65,11.548 18.964,11.235 R5.2
NetR2_2: R2.2 U3.2 U3.7 | length 8.8
  Top Layer w0.3: U3.2 32.08,19.632 R2.2@32.564,20.117
  Top Layer w0.481: U3.7 28.83,18.317 30.63,20.117 32.564,20.117 R2.2
NetR4_1: R4.1 R9.1 R11.2 U4.13 | length 28.1
  Top Layer w0.481: R4.1 27.103,16.001 v1(27.127,15.977) ; v1(41.224,16.459) U4.13@42.927,16.459 ; R11.2 42.367,18.743 42.335,18.712 42.335,17.05 U4.13@42.927,16.459 ; U4.13@43.663,16.459 U4.13@42.927,16.459 ; U4.13@43.688,16.383 45.136,16.383 v1(45.161,16.358)
  Bottom Layer w0.481: v1(27.127,15.977) 39.627,15.977 39.959,16.308 41.073,16.308 v1(41.224,16.459) ; v1(45.161,16.358) 45.161,14.542 v1(46.685,13.018)
NetR4_2: R4.2 U3.10 U3.15 | length 17.5
  Top Layer w0.3: v1(28.762,8.89) 28.83,8.958 U3.10 ; v1(31.772,9.848) 31.772,10.11 32.051,10.39 32.051,11.22 U3.15
  Bottom Layer w0.3: v1(25.4,17.755) 26.215,16.939 26.215,15.599 26.265,15.549 26.265,11.429 28.762,8.932 v1(28.762,8.89) ; v1@28.804,8.89 30.814,8.89 v1(31.772,9.848)
NetR5_1: R5.1 R7.2 U1.9 | length 8.6
  Top Layer w0.481: R5.1 20.864,11.326 21.086,11.548 23.04,11.548 23.607,12.116 25.451,12.116 R7.2
NetR7_1: R7.1 TP6.1 U1.8 U3.6 U3.14 | length 19.6
  Top Layer w0.481: U1.8 22.439,10.363 25.4,10.363 R7.1@25.413,10.375 ; TP6.1 25.4,8.001 25.413,8.014 R7.1@25.413,10.375 ; v1(27.177,11.831) 27.026,11.68 26.694,11.68 25.413,10.398 R7.1@25.413,10.375 ; U3.6 29.48,15.148 31.43,13.198 U3.14 ; v1(30.404,12.446) 30.446,12.404 30.901,12.404 U3.14@31.414,11.891
  Bottom Layer w0.481: v1(27.177,11.831) 29.73,11.831 30.345,12.446 v1(30.404,12.446)
NetR18_2: R18.2 TP2.1 U1.1 U1.2 | length 40.9
  Top Layer w0.481: U1.1 U1.2 17.502,16.726 19.621,16.726 v1(19.66,16.764) ; v1(43.559,6.992) 43.601,7.034 43.879,7.034 44.871,8.026 R18.2 44.894,6.74 44.171,6.016 TP2.1
  Bottom Layer w0.481: v1(19.66,16.764) 21.615,16.764 22.085,16.294 22.085,7.607 22.7,6.992 v1(43.559,6.992)
NetR19_2: R19.2 U5.9 | length 37.2
  Top Layer w0.481: v1(36.424,23.47) 36.495,23.399 45.433,23.399 45.715,23.117 45.715,20.968 45.698,20.951 45.698,20.627 45.06,19.989 v1(45.06,19.914)
  Bottom Layer w0.481: v1(19.152,31.674) 20.574,31.674 21.387,30.861 35.23,30.861 35.535,30.556 35.535,24.359 v1(36.424,23.47)
NetTP12_1: TP12.1 U5.20 | length 4
  Top Layer w0.481: U5.20@28.321,24.359 28.321,25.555 28.88,26.114 v1(28.88,26.213)
  Bottom Layer w0.481: v1(28.88,26.213) 29.007,26.34 29.007,27.94 TP12.1
NetTP13_1: TP13.1 U5.21 | length 4.3
  Top Layer w0.481: U5.21@29.591,24.359 29.825,24.593 29.825,25.243 30.582,25.999 v1(30.582,26.213)
  Bottom Layer w0.481: v1(30.582,26.213) 30.582,26.426 30.818,26.663 30.818,27.872 TP13.1
NetTP14_1: TP14.1 U5.26 | length 3.1
  Top Layer w0.481: v1(34.809,27.026) 34.924,26.911 36.029,26.911 U5.26@36.24,26.7
  Bottom Layer w0.481: TP14.1 33.985,26.03 34.809,26.853 v1(34.809,27.026)
NetTP15_1: TP15.1 U5.22 | length 4.6
  Top Layer w0.481: U5.22@30.861,24.359 30.886,24.359 31.121,24.593 31.121,24.999 v1(32.309,26.187)
  Bottom Layer w0.481: v1(32.309,26.187) 32.309,26.401 32.749,26.841 32.749,27.872 TP15.1
NetTP16_1: TP16.1 U5.17 | length 4.2
  Top Layer w0.481: v1(23.52,26.365) 23.52,26.152 24.251,25.421 24.251,24.618 U5.17@24.511,24.359
  Bottom Layer w0.481: TP16.1 23.334,27.821 23.334,26.765 23.52,26.579 v1(23.52,26.365)
NetTP17_1: TP17.1 U5.16 | length 4.5
  Top Layer w0.481: v1(21.59,26.314) 22.956,24.948 22.956,24.593 23.191,24.359 U5.16
  Bottom Layer w0.481: TP17.1 21.277,27.796 21.277,26.841 21.59,26.528 v1(21.59,26.314)
NetTP18_1: TP18.1 U5.18 | length 3.9
  Top Layer w0.481: v1(25.222,26.314) 25.222,26.114 25.781,25.555 U5.18@25.781,24.359
  Bottom Layer w0.481: TP18.1 25.209,28.029 25.209,26.327 v1(25.222,26.314)
NetTP19_1: TP19.1 U5.19 | length 3.8
  Top Layer w0.481: U5.19@27.051,24.359 27.051,26.238 v1(27.102,26.289)
  Bottom Layer w0.481: v1(27.102,26.289) 27.165,26.352 27.165,28.003 TP19.1
NetTP20_1: TP20.1 U5.30 | length 2.8
  Top Layer w0.481: U5.30 36.27,31.725 37.441,31.725 38.381,30.785 TP20.1
NetTP21_1: TP21.1 U5.31 | length 2.5
  Top Layer w0.481: U5.31 37.432,33.029 37.686,33.282 38.388,33.282 TP21.1
NetTP22_1: TP22.1 U5.4 | length 1.6
  Top Layer w0.481: TP22.1 17.683,38.003 19.005,38.003 U5.4@19.111,38.109
NetTP23_1: TP23.1 U5.5 | length 14.1
  Top Layer w0.481: TP23.1 16.612,26.06 16.612,29.885 17.348,30.622 v1(17.348,30.836) ; U5.5@19.111,36.839 19.118,36.839 v1(19.152,36.805)
  Bottom Layer w0.481: v1(17.348,30.836) 18.059,31.547 18.059,35.712 v1(19.152,36.805)
NetTP24_1: TP24.1 U5.11 | length 6
  Top Layer w0.481: TP24.1 17.247,28.092 18.113,28.959 18.876,28.959 19.111,29.194 U5.11@19.111,29.219
NetU1_5: U1.5 U2.2 U2.7 | length 15.4
  Top Layer w0.3: U2.2 10.337,14.882 v1(10.36,14.859) ; v1(12.903,14.91) 12.903,14.865 14.89,12.878 U1.5
  Top Layer w0.481: U2.7 7.103,17.037 7.103,17.664 7.727,18.288 10.056,18.288 10.338,18.006 U2.2@10.338,17.022
  Bottom Layer w0.3: v1(10.36,14.859) 10.386,14.884 12.878,14.884 v1(12.903,14.91)
NetU1_10: U1.10 U2.10 U2.15 | length 21.2
  Top Layer w0.3: U2.10 7.116,11.15 7.116,12.138 v1(7.691,12.713) ; v1(10.16,13.538) 10.337,13.361 10.337,10.623 10.79,10.17 11.44,10.17 v1(12.294,11.024) ; v1(20.883,12.752) 20.946,12.815 22.351,12.815 U1.10
  Bottom Layer w0.3: v1(7.691,12.713) 8.516,13.538 v1(10.16,13.538) ; v1(12.294,11.024) 12.294,11.303 13.743,12.752 v1(20.883,12.752)
OUT4_1: R9.2 TP7.1 U1.13 U1.14 | length 39
  Top Layer w0.481: TP7.1 22.504,18.017 22.445,17.958 U1.14 U1.13 22.439,16.662 22.452,16.675 23.66,16.675 v1(23.673,16.662) ; R9.2 v1(46.711,11.239)
  Bottom Layer w0.481: v1(23.673,16.662) 23.673,8.636 24.638,7.671 43.326,7.671 43.917,8.261 43.917,8.583 44.198,8.865 46.429,8.865 46.711,9.146 v1(46.711,11.239)
OUT4_2: R11.1 R17.2 TP9.1 U4.14 | length 15.1
  Top Layer w0.481: R11.1 40.637,20.396 40.903,20.662 40.903,20.685 41.25,21.033 41.462,21.244 43.038,21.244 43.663,20.62 U4.14 44.29,17.678 45.749,17.678 46.842,18.771 47.828,18.771 47.828,21.334 47.812,21.35 46.862,21.35 R17.2
RX: J3.2 U5.34 | length 11.3
  Top Layer w0.481: U5.34 36.291,36.784 47.468,36.784 J3.2
TX: J3.3 U5.35 | length 11.8
  Top Layer w0.481: U5.35 U5.35@36.261,38.109 ; U5.35@36.283,38.131 U5.35@36.261,38.109 ; J3.3@47.517,39.262 J3.3 47.391,39.268 46.231,38.109 U5.35@36.261,38.109
VDD: C7.1 C8.1 C9.1 C10.1 C12.1 C13.1 C14.1 C15.2 J3.1 LED1.2 R10.1 R15.1 R16.1 REG.3 U1.4 U2.13 U3.13 U4.4 U5.2 | length 159.2
  Top Layer w0.3: C14.1@8.834,9.804 8.834,10.402 U2.13@9.037,10.606 ; U2.13 9.037,12.231 9.22,12.414 v1(9.22,12.522) ; C12.1 15.682,15.215 U1.4@16.599,14.298 ; U3.13 30.808,11.22 30.808,9.911 C13.1 30.864,8.853 31.101,8.616 31.101,4.802 31.483,4.42 R10.1 32.827,4.42 33.78,5.372 35.217,5.372 37.008,7.163 C15.2 37.019,13.88 38.359,13.88 38.37,13.868 U4.4 ; U4.4@38.713,13.919 39.333,13.919 40.312,14.899 40.312,18.087 v1(41.453,19.228)
  Top Layer w0.481: 8.997,29.337 11.33,29.337 C8.1 C7.1 ; R16.1 11.341,39.549 11.341,41.528 C10.1 15.262,41.541 15.497,41.306 15.497,40.93 15.778,40.649 ; v1(43.637,39.853) 43.663,39.878 43.663,41.529 LED1.2
  Top Layer w0.6: 15.778,40.649 U5.2@19.111,40.649
  Top Layer w1: v1(5.664,26.213) 5.716,26.264 5.716,27.902 6.302,28.488 7.723,28.488 8.534,29.299 8.534,38.722 9.349,39.536 R16.1 ; v1(14.732,14.326) 14.805,14.326 14.983,14.148 U1.4 ; U5.2@19.111,40.649 19.145,40.615 v1(22.581,40.615) ; v1(38.995,27.153) 41.891,30.048 47.168,30.048 47.754,30.634 47.754,33.958 J3.1
  Bottom Layer w0.3: v1(9.22,12.522) 12.929,12.522 v1(14.732,14.326) ; v1(38.995,27.153) 41.453,24.695 v1(41.453,19.228)
  Bottom Layer w0.481: v1(43.637,39.853) 43.637,38.075 J3.1
  Bottom Layer w1: v1(5.664,26.213) 5.664,21.668 6.25,21.082 13.994,21.082 14.58,20.496 14.58,14.478 v1(14.732,14.326) ; v1(22.581,40.615) 35.408,40.615 38.995,37.027 v1(38.995,27.153)
Vin+: C1.1 J1.3 TP1.1 U1.3 | length 32
  Top Layer w0.481: C1.1 7.506,7.162 7.506,3.188 TP1.1 7.468,1.577 7.749,1.295 16.586,1.295 J1.3 ; U1.3 18.923,15.418 19.321,15.02 19.321,11.701 19.606,11.416 19.606,7.029 18.237,5.661 v1(18.237,5.639)
  Bottom Layer w0.481: J1.3 18.059,2.87 18.059,5.402 18.237,5.58 v1(18.237,5.639)
Vin-: C2.2 J1.2 TP8.1 U1.12 | length 29.4
  Top Layer w0.4: J1.2 20.65,5.581 20.262,5.969 20.262,8.346 20.321,8.406 20.321,11.467 19.863,11.926 19.863,15.183 20.097,15.418 U1.12
  Top Layer w0.481: C2.2 9.868,7.187 9.868,4.864 TP8.1 18.618,4.851 J1.2
pads on no net: BOOT.1 BOOT.4 EN.1 EN.4 J1.1 S1.1 U2.4 U2.12 U3.4 U3.12 U4.5 U4.6 U4.7 U5.6 U5.7 U5.10 U5.12 U5.13 U5.14 U5.23 U5.24 U5.29 U5.32 U5.33 U5.36 U5.37
copper on no net:
  other v1: 42.74,22.6

## Polygon pours and split planes (outlines as drawn)
GND on Top Layer "NONET_L06_P-001" (solid, remove dead copper, pour order 7): 15.212,20.496 24.13,20.496 24.13,8.932 15.201,8.932 15.199,8.93
GND on Top Layer "NONET_L06_P-001" (solid, remove dead copper, pour order 5): -5.322,42.799 -5.322,42.824 6.96,42.824 6.96,30.226 6.934,30.201 1.548,30.201 1.548,32.459 -5.322,32.459 -5.322,42.71 -5.322,42.799 -5.322,42.824
GND on Top Layer "NONET_L06_P-001" (solid, remove dead copper, pour order 4): 36.805,22.073 36.711,22.073 48.768,22.073 48.768,6.909 48.768,6.408 36.711,6.408 36.711,21.928 36.711,22.073
GND on Top Layer "NONET_L06_P-001" (solid, remove dead copper, pour order 1): 6.706,27.432 9.982,27.432 9.982,28.321 16.027,28.321 16.027,26.467 12.852,26.467 12.852,24.714 6.68,24.714
VDD on Top Layer "NONET_L06_P-001" (solid, pour order 0): 16.84,41.961 16.84,40.132 16.713,40.132 12.116,40.132 12.116,38.608 7.925,38.608 7.925,41.961
GND on Bottom Layer "NONET_L06_P-001" (solid, pour order 6): 22.784,43.231 22.784,43.485 34.366,43.485 34.366,32.537 22.86,32.537
GND on Int2 (GND) (split plane): 49.49,0.51 0.51,0.51 0.51,29.972 0.501,30.072 0.472,30.167 0.424,30.256 0.361,30.333 0.284,30.396 0.195,30.444 0.1,30.473 0,30.482 -5.916,30.482 -5.916,43.355 0,43.355 0.1,43.365 0.195,43.394 0.284,43.441 0.361,43.505 0.424,43.582 0.472,43.67 0.501,43.766 0.51,43.866 0.51,49.49 14.222,49.49 14.222,44.526 14.231,44.427 14.26,44.331 14.308,44.243 14.371,44.165 14.448,44.102 14.537,44.055 14.632,44.026 14.732,44.016 40.691,44.016 40.79,44.026 40.886,44.055 40.974,44.102 41.052,44.165 41.115,44.243 41.162,44.331 41.191,44.427 41.201,44.526 41.201,49.49 49.49,49.49
GND on Int1 (GND) (split plane): 49.49,0.51 0.51,0.51 0.51,29.972 0.501,30.072 0.472,30.167 0.424,30.256 0.361,30.333 0.284,30.396 0.195,30.444 0.1,30.473 0,30.482 -5.916,30.482 -5.916,43.355 0,43.355 0.1,43.365 0.195,43.394 0.284,43.441 0.361,43.505 0.424,43.582 0.472,43.67 0.501,43.766 0.51,43.866 0.51,49.49 14.222,49.49 14.222,44.526 14.231,44.427 14.26,44.331 14.308,44.243 14.371,44.165 14.448,44.102 14.537,44.055 14.632,44.026 14.732,44.016 40.691,44.016 40.79,44.026 40.886,44.055 40.974,44.102 41.052,44.165 41.115,44.243 41.162,44.331 41.191,44.427 41.201,44.526 41.201,49.49 49.49,49.49

## Silkscreen, mask and mechanical layers (free items; w line width, h text height)
Bottom Overlay:
  drawing of 131 lines, arcs and shapes, not listed